# Altium PCB Fast_Servo.PCBDOC (part 6 of 11)
Units mm, origin at the board's own origin, x right, y up, seen from the top; angles counter-clockwise.
Board outline 162.48 x 100 mm, 6 copper layers (Top, GP1(GND), L3, L4, P3V3, Bot), stack 1.716 mm thick; 668 components, 491 nets, 2308 pads, 1133 vias.
Unrouted connection lines stored in the file: 2.
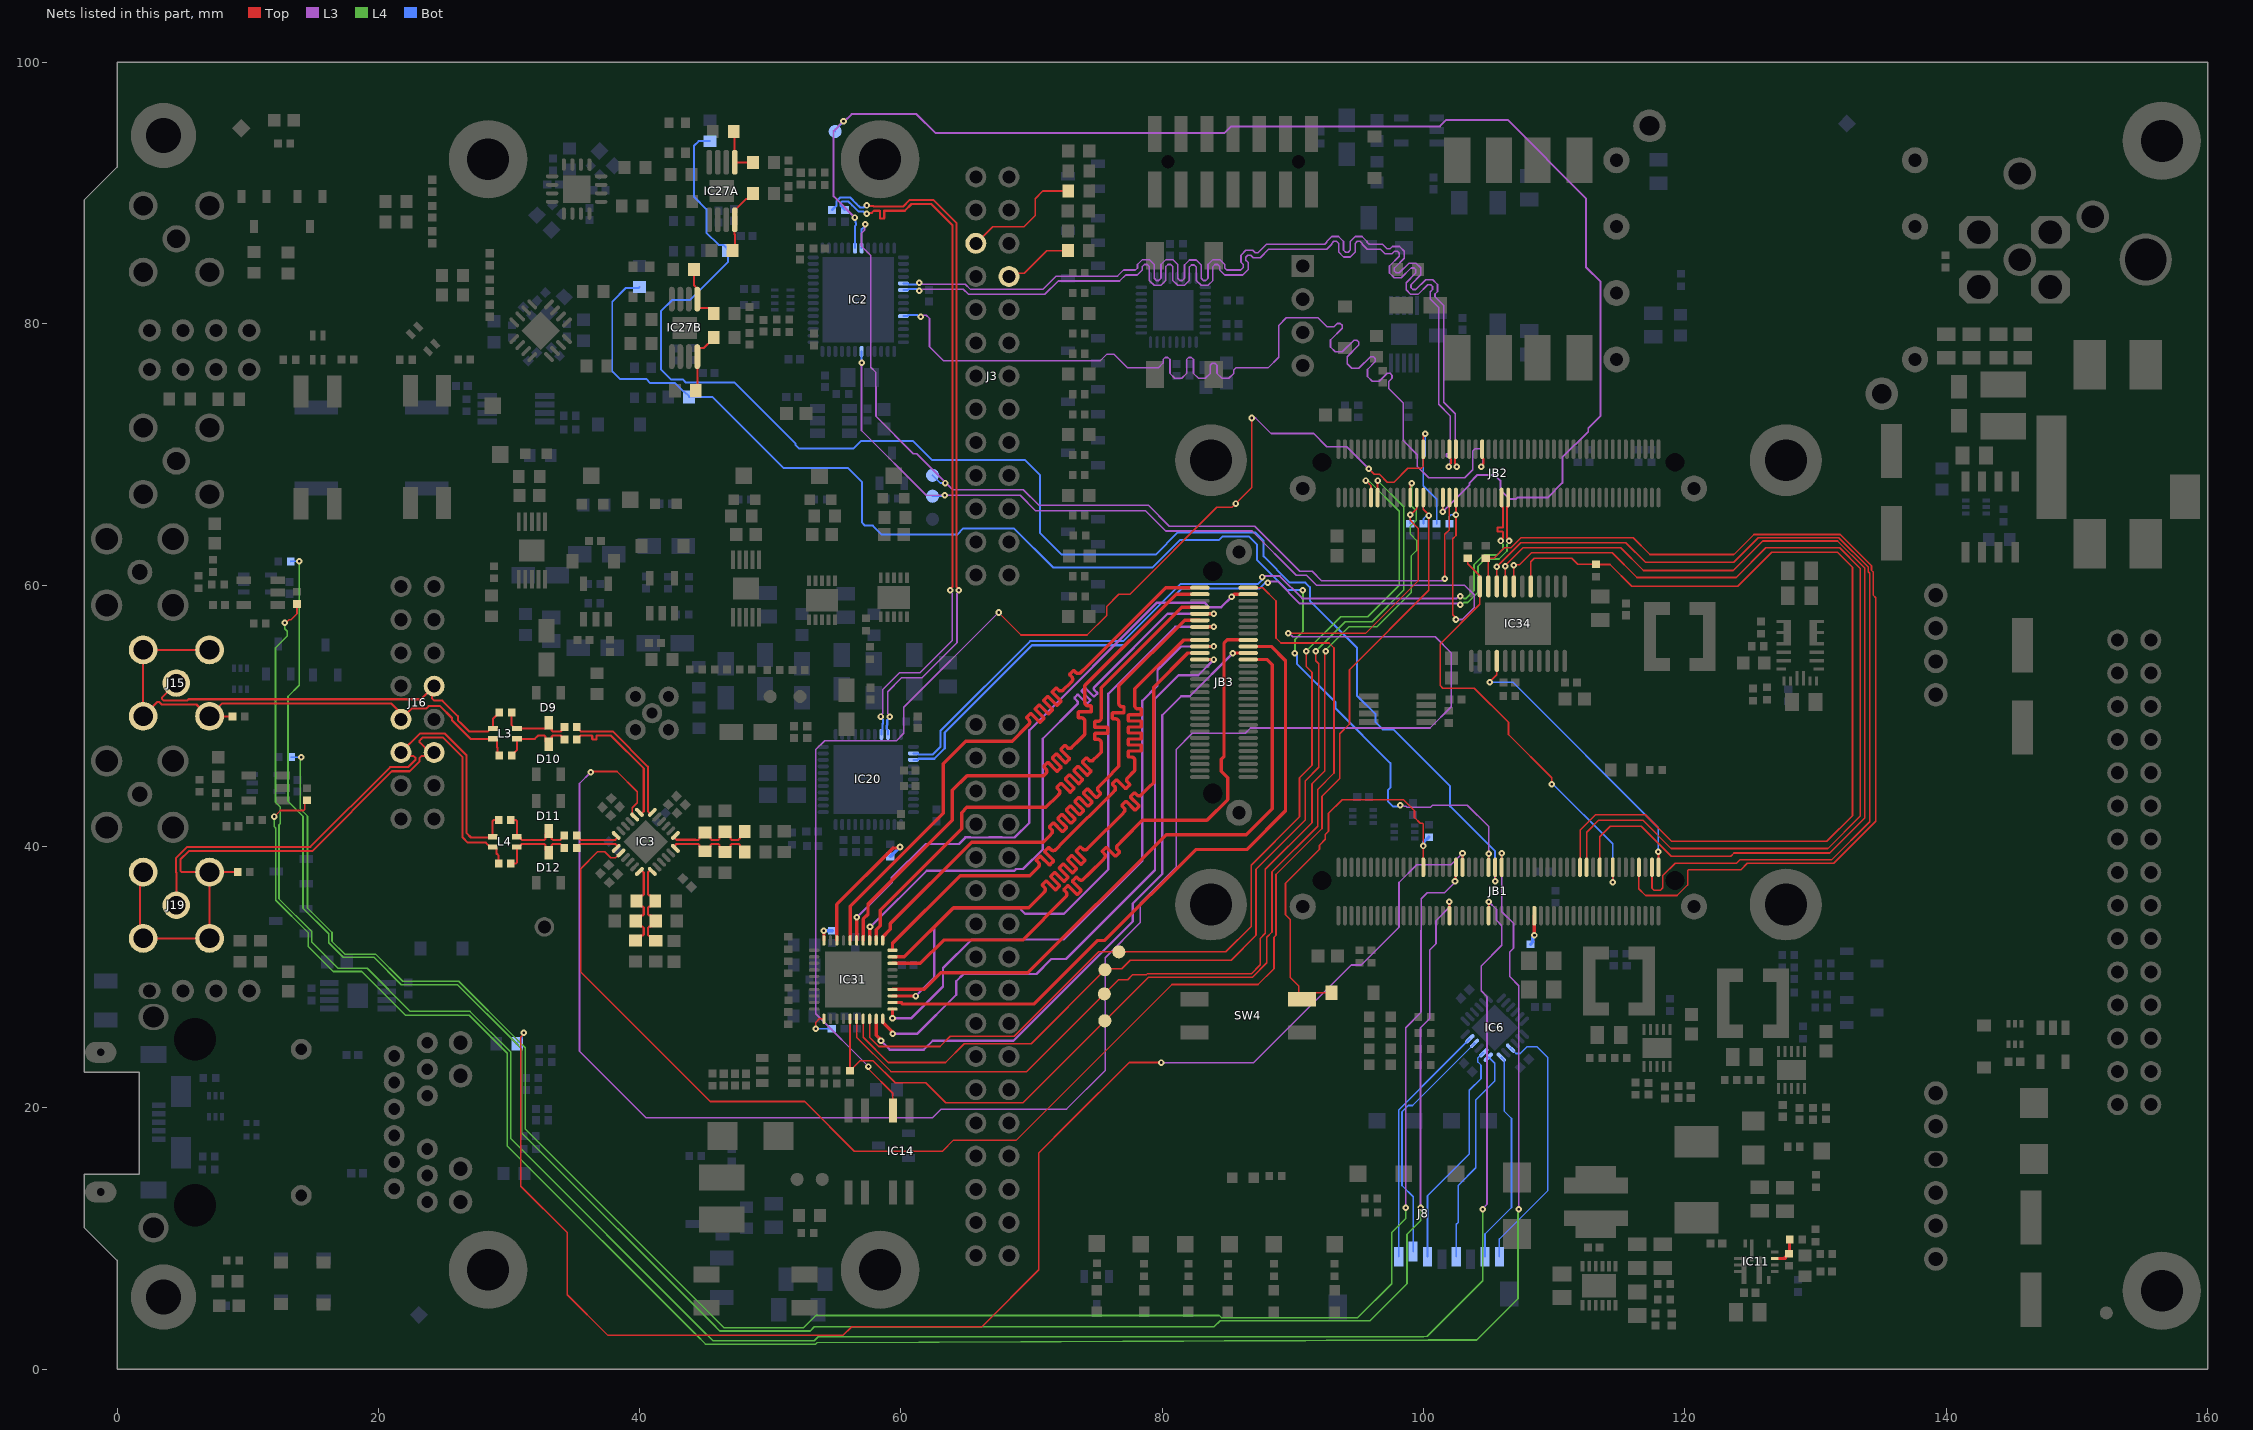
[diagram p8: the nets of this part, all layers, seen from the top]

## Via types
v1: diameter 0.5, hole 0.2, Top to Bot, tented both sides, 1045 vias
v2: diameter 0.8, hole 0.4, Top to Bot, tented both sides, 40 vias
v3: diameter 0.6, hole 0.3, Top to Bot, tented both sides, 27 vias
v4: diameter 1.27, hole 0.711, Top to Bot, tented both sides, 11 vias
v5: diameter 0.7, hole 0.5, Top to Bot, tented both sides, 10 vias

## Nets (pads, with @x,y where several pads share a name; then routed paths per layer and width w, separated by ;. In a path a pad name is that pad's centre, name@x,y a point inside that pad or via, vN(x,y) a via of type N, cw(c..) or ccw(c..) an arc to the next point about the centre after c; other vN are vias at no path point) (continued)
ADC_CTRL.DCO_P: IC2.36 JB2.45 | length 78.5
  Top w0.16: v1(104.423,69.055) 104.423,69.149 104.584,69.311 104.584,69.654 104.475,69.764 JB2.45@104.475,70.404
  L3 w0.125: v1(61.504,80.525) 61.605,80.525 61.731,80.651 61.941,80.651 62.184,80.408 62.184,78.247 63.271,77.16 75.24,77.16 75.737,77.657 76.333,77.657 77.366,76.624 79.68,76.624 80.059,77.004 80.059,77.264 80.22,77.424 80.424,77.424 80.584,77.264 80.584,76.204 80.964,75.824 81.48,75.824 81.86,76.204 81.86,77.264 82.02,77.424 82.224,77.424 82.384,77.264 82.384,76.204 82.764,75.824 83.28,75.824 83.66,76.204 83.66,76.829 83.82,76.989 84.024,76.989 84.185,76.829 84.185,76.204 84.564,75.824 85.08,75.824 85.46,76.204 85.46,76.464 85.62,76.624 86.11,76.624 88.097,76.624 88.904,77.431 88.904,79.87 89.494,80.46 91.91,80.46 92.6,79.77 93.137,79.77 93.392,80.024 93.618,80.024 93.763,79.88 93.763,79.653 92.872,78.762 92.872,78.225 93.236,77.861 93.773,77.861 94.664,78.752 94.891,78.752 95.036,78.607 95.036,78.38 94.145,77.489 94.145,76.952 94.509,76.588 95.046,76.588 95.937,77.479 96.164,77.479 96.308,77.334 96.308,77.108 95.705,76.504 95.705,75.967 96.069,75.602 96.607,75.602 97.21,76.206 97.437,76.206 97.581,76.061 97.581,75.835 97.327,75.58 97.327,75.043 98.437,73.932 98.437,71.066 99.52,69.984 99.52,69.086 100.388,68.218 103.137,68.218 103.755,68.836 103.755,70.269 103.925,70.439 104.38,70.439 104.549,70.27 104.549,69.283 104.423,69.157 v1(104.423,69.055)
  Bot w0.16: IC2.36@60.184,80.589 60.497,80.589 60.587,80.678 61.258,80.678 61.412,80.525 v1(61.504,80.525)
ADC_CTRL.FR_N: IC2.31 JB2.37 | length 77.3
  Top w0.16: JB2.37@102.475,70.404 102.475,69.764 102.389,69.678 102.389,69.311 102.55,69.149 v1(102.55,69.055)
  L3 w0.125: v1(61.405,83.152) 61.506,83.152 61.632,83.026 64.925,83.026 65.32,82.63 70.86,82.63 71.88,83.651 76.573,83.651 77.037,84.115 77.939,84.115 78.099,84.275 78.099,84.535 78.479,84.915 78.994,84.915 79.374,84.535 79.374,83.475 79.534,83.315 79.739,83.315 79.899,83.475 79.899,84.535 80.279,84.915 80.794,84.915 81.174,84.535 81.174,83.475 81.334,83.315 81.539,83.315 81.699,83.475 81.699,84.5 82.079,84.88 82.594,84.88 82.974,84.5 82.974,83.475 83.134,83.315 83.339,83.315 83.499,83.475 83.499,84.535 83.879,84.915 84.394,84.915 84.774,84.535 84.774,84.275 84.934,84.115 86.009,84.115 86.204,84.309 86.204,84.536 86.02,84.719 86.02,85.257 86.384,85.621 86.921,85.621 87.105,85.437 87.332,85.437 87.98,86.085 92.436,86.085 92.596,86.245 92.596,86.305 92.976,86.685 93.491,86.685 93.871,86.305 93.871,85.645 94.031,85.485 94.236,85.485 94.396,85.645 94.396,86.305 94.776,86.685 95.291,86.685 95.671,86.305 95.671,86.245 95.831,86.085 96.851,86.085 97.202,85.735 97.428,85.735 97.612,85.918 98.149,85.918 98.514,85.554 98.514,85.017 97.764,84.267 97.764,84.041 97.909,83.896 98.135,83.896 98.885,84.646 99.422,84.646 99.786,84.281 99.786,83.744 99.037,82.995 99.037,82.768 99.182,82.623 99.408,82.623 100.158,83.373 100.695,83.373 101.059,83.008 101.059,82.471 100.875,82.287 100.875,82.061 101.54,81.396 101.54,73.991 102.424,73.106 102.424,70.101 102.424,69.283 102.55,69.157 v1(102.55,69.055)
  Bot w0.16: IC2.31@60.184,83.088 60.497,83.088 60.587,82.998 61.16,82.998 61.313,83.152 v1(61.405,83.152)
ADC_CTRL.FR_P: IC2.32 JB2.35 | length 77.2
  Top w0.16: v1(101.923,69.055) 101.923,69.149 102.084,69.311 102.084,69.654 101.975,69.764 JB2.35@101.975,70.404
  L3 w0.125: v1(61.405,82.525) 61.506,82.525 61.632,82.651 64.769,82.651 65.165,82.255 71.015,82.255 72.036,83.276 76.729,83.276 77.193,83.74 78.094,83.74 78.474,84.12 78.474,84.38 78.634,84.54 78.839,84.54 78.999,84.38 78.999,83.32 79.379,82.94 79.894,82.94 80.274,83.32 80.274,84.38 80.434,84.54 80.639,84.54 80.799,84.38 80.799,83.32 81.179,82.94 81.694,82.94 82.074,83.32 82.074,84.345 82.234,84.505 82.439,84.505 82.599,84.345 82.599,83.32 82.979,82.94 83.494,82.94 83.874,83.32 83.874,84.38 84.034,84.54 84.239,84.54 84.399,84.38 84.399,84.12 84.779,83.74 86.165,83.74 86.579,84.154 86.579,84.691 86.395,84.875 86.395,85.101 86.54,85.246 86.766,85.246 86.95,85.062 87.487,85.062 88.135,85.71 92.591,85.71 92.971,86.09 92.971,86.15 93.131,86.31 93.336,86.31 93.496,86.15 93.496,85.49 93.876,85.11 94.391,85.11 94.771,85.49 94.771,86.15 94.931,86.31 95.136,86.31 95.296,86.15 95.296,86.09 95.676,85.71 96.696,85.71 97.046,85.36 97.584,85.36 97.767,85.543 97.994,85.543 98.139,85.399 98.139,85.172 97.389,84.423 97.389,83.886 97.753,83.521 98.291,83.521 99.04,84.271 99.267,84.271 99.411,84.126 99.411,83.899 98.662,83.15 98.662,82.613 99.026,82.248 99.563,82.248 100.313,82.998 100.539,82.998 100.684,82.853 100.684,82.627 100.5,82.443 100.5,81.906 101.165,81.241 101.165,73.835 102.049,72.951 102.049,70.101 cw(c102.012,70.101) 102.012,70.064 101.787,70.064 ccw(c101.787,70.026) 101.749,70.026 101.749,69.851 ccw(c101.787,69.851) 101.787,69.814 102.012,69.814 cw(c102.012,69.776) 102.049,69.776 102.049,69.564 102.049,69.535 102.049,69.283 101.923,69.157 v1(101.923,69.055)
  Bot w0.16: IC2.32@60.184,82.589 60.497,82.589 60.587,82.678 61.16,82.678 61.313,82.525 v1(61.405,82.525)
ADC_SCK: IC2.20 JB2.34 TP26.1 | length 109
  Top w0.125: v1(101.475,65.629) JB2.34@101.475,66.704
  L3 w0.152: v1(56.464,88.134) 54.842,89.757 54.842,94.747 55.597,95.503 55.677,95.503 56.225,96.051 61.187,96.051 62.626,94.611 84.77,94.611 85.275,95.116 101.242,95.116 101.729,95.603 106.422,95.603 112.425,89.6 112.425,84.348 113.549,83.224 113.549,72.96 112.6,72.011 112.6,71.75 110.623,69.774 110.623,67.824 109.496,66.697 107.177,66.697 107.08,66.6 106.57,66.6 105.877,67.293 105.877,67.996 105.444,68.429 104.12,68.429 103.495,67.804 103.495,67.649 v1(101.475,65.629)
  Bot w0.152: TP26.1@54.963,94.721 54.963,94.854 55.6,95.491 v1(55.6,95.5) ; v1(56.464,88.134) 56.531,88.068 56.531,87.749 56.574,87.706 56.574,87.58 56.484,87.49 IC2.20@56.484,85.788
ADC_SDI: IC2.21 JB2.36 TP27.1 | length 73.7
  Top w0.125: v1(101.625,60.5) 101.625,63.892 101.975,64.242 JB2.36@101.975,66.704
  L3 w0.125: v1(57.278,87.629) 57.211,87.563 57.211,87.158 56.984,86.931 56.984,85.941 57.693,85.232 57.693,76.669 58.082,76.28 58.082,75.193 58.087,75.187 58.087,72.921 60.948,70.061 61.212,70.061 63.968,67.305 69.36,67.305 70.54,66.125 78.915,66.125 80.54,64.5 87.073,64.5 90.518,61.055 91.472,61.055 92.205,60.321 101.446,60.321 v1(101.625,60.5)
  Bot w0.125: TP27.1@62.415,68.404 63.005,67.814 v1(63.4,67.814)
  Bot w0.152: IC2.21@56.984,85.788 56.984,87.247 57.278,87.541 v1(57.278,87.629)
ADC_SDO: IC2.46 JB2.38 R184.1 TP28.1 | length 72.5
  Top w0.125: v1(102.475,57.368) 102.475,57.47 102.222,57.723 102.222,63.542 102.475,63.795 v1(102.475,65.4) JB2.38@102.475,66.704
  L3 w0.125: v1(56.984,77.022) 56.984,71.83 61.943,66.871 v1(63.347,66.871) 69.131,66.871 70.323,65.679 78.724,65.679 80.262,64.141 86.867,64.141 90.248,60.76 91.036,60.76 91.796,60 103.13,60 103.876,59.254 103.876,58.293 102.951,57.368 v1(102.475,57.368)
  Bot w0.125: v1(56.984,77.022) IC2.46@56.984,77.888 ; TP28.1@62.415,66.804 63.28,66.804 v1(63.347,66.871) ; R184.1@101.975,64.707 101.975,65.251 102.123,65.4 v1(102.475,65.4)
AFE_GAIN_X10A: JB1.49 R40A.1 R58A.1 | length 114.4
  Top w0.125: v1(105.475,37.329) JB1.49@105.475,38.404
  Bot w0.152: R58A.1@45.374,93.975 44.513,93.975 44.159,93.622 44.159,89.72 45.105,88.774 45.105,86.981 46.052,86.035 46.39,86.035 46.764,85.661 46.764,84.733 43.869,81.838 42.514,81.838 41.629,80.954 41.629,76.512 42.396,75.746 43.298,75.746 43.547,75.497 47.273,75.497 51.922,70.849 51.922,70.744 52.222,70.444 56.35,70.444 56.949,71.044 60.915,71.044 62.366,69.593 69.47,69.593 70.659,68.404 70.659,63.98 72.3,62.339 79.487,62.339 81.186,64.037 87.108,64.037 87.748,63.397 87.748,62.201 89.754,60.194 90.951,60.194 91.3,59.846 91.3,58.803 94.9,55.203 94.9,51.549 96.32,50.129 96.32,49.506 96.869,48.957 97.67,48.957 102.033,44.595 102.033,43.068 105.475,39.625 v1(105.475,37.329)
AFE_GAIN_X10B: JB1.47 R40B.1 R58B.1 | length 103.7
  Top w0.125: JB1.47@104.975,38.404 v1(104.975,39.446)
  L3 w0.125: v1(98.2,43.142) 98.268,43.074 98.637,43.074 98.7,43.012 100.539,43.012 100.678,43.15 103.345,43.15 104.975,41.52 v1(104.975,39.446)
  L4 w0.152: v1(90.149,54.8) 90.149,55.833 90.751,56.436 90.751,59.613 v1(90.75,59.615)
  Bot w0.152: R58B.1@40,82.82 39.935,82.755 38.956,82.755 37.903,81.702 37.903,76.366 38.481,75.788 40.499,75.788 40.821,75.466 42.71,75.466 43.362,74.815 43.412,74.815 43.786,74.441 R40B.1@43.786,74.391 45.593,74.391 51.039,68.946 55.956,68.946 57,67.902 57,64.795 57.245,64.55 57.84,64.55 58.525,63.866 64.295,63.866 64.768,64.339 68.647,64.339 71.634,61.352 79.268,61.352 81.376,63.459 84.356,63.459 84.627,63.731 86.633,63.731 87.246,63.119 87.246,61.946 89.577,59.615 v1(90.75,59.615) ; v1@90.3,54.712 90.3,53.994 93.257,51.036 93.257,50.569 97.45,46.376 97.45,44.503 97.28,44.333 97.28,43.433 97.645,43.068 97.981,43.068 97.989,43.076 98.133,43.076 v1(98.2,43.142)
AFE_OUTA_N: IC27A.5 R41A.2 R203A.1 | length 3.7
  Top w0.152: R41A.2@47.199,94.721 47.274,94.646 47.274,92.499 47.412,92.362 R203A.1@48.675,92.362
AFE_OUTA_P: IC27A.4 R43A.2 R201A.1 | length 5.2
  Top w0.16: R43A.2@47.099,85.594 47.306,85.801 47.306,86.816 47.274,86.848 47.274,88.687 48.155,89.567 48.305,89.567 48.675,89.937 R201A.1@48.675,89.987
AFE_OUTB_N: IC27B.5 R41B.2 R203B.1 | length 4.4
  Top w0.16: R41B.2@44.163,84.165 44.163,82.941 44.413,82.691 IC27B.5@44.413,81.887 44.413,81.347 44.547,81.213 45.295,81.213 45.665,80.843 R203B.1@45.665,80.793
AFE_OUTB_P: IC27B.4 R43B.2 R201B.1 | length 4.8
  Top w0.16: R43B.2@44.3,74.875 44.413,74.988 IC27B.4@44.413,77.487 44.413,77.999 44.547,78.132 44.89,78.132 45.665,78.907 R201B.1@45.665,78.957
AGND_P5V5: IC11.3 R142.1 R143.2 | length 2.4
  Top w0.25: IC11.3@126.877,8.47 127.667,8.47 127.667,8.569 127.94,8.842 R142.1@127.96,8.842 127.998,8.881 127.998,9.881 R143.2@128.037,9.92
AT_EVENT: IC14.4 JB2.27 R152.1 | length 105.7
  Top w0.125: v1(57.513,23.155) 57.513,22.97 59.381,21.102 IC14.4@59.381,19.803 ; v1(67.47,57.904) 69.191,56.183 74.241,56.183 75.739,57.682 75.739,58.366 76.678,59.305 77.527,59.305 84.176,65.954 85.338,65.954 v1(85.628,66.244) 86.85,67.465 v1(86.85,72.79) ; v1(95.804,68.905) 96.229,68.48 96.625,68.48 97.222,67.883 97.736,67.883 98.794,68.941 99.83,68.941 99.975,69.086 JB2.27@99.975,70.404 99.975,71.45 v1(100.125,71.6)
  L3 w0.125: v1(57.513,23.155) 53.476,27.191 53.476,47.421 54.156,48.1 59.65,48.1 60.208,48.658 60.208,50.642 v1(67.47,57.904) ; v1(86.85,72.79) 87.135,72.79 88.325,71.6 91.585,71.6 92.585,70.6 94.109,70.6 v1(95.804,68.905)
  Bot w0.125: v1(95.804,68.905) v1@95.817,68.891 ; v1(100.125,71.6) 100.125,69.885 99.975,69.735 99.975,67.599 101,66.574 R152.1@101,64.67
CH1_DAC_IN_R_N: C53.1 IC3.7 R59.1 R61.2 | length 7.2
  Top w0.16: IC3.7@42.734,40.845 42.654,40.765 42.654,40.674 42.818,40.51 44.268,40.51 44.27,40.507 44.485,40.507 44.579,40.601 44.579,40.698 44.949,41.068 R59.1@44.999,41.068 45.049,41.068 45.419,40.698 45.419,40.601 45.513,40.507 46.023,40.507 46.117,40.601 46.117,40.726 46.512,41.121 C53.1@46.537,41.121 46.562,41.121 46.957,40.726 46.957,40.601 47.051,40.507 47.554,40.507 47.665,40.619 47.665,40.773 R61.2@48.035,41.143
CH1_DAC_IN_R_P: C55.1 IC3.6 R65.2 R67.1 | length 7.2
  Top w0.16: IC3.6@42.734,39.855 42.654,39.935 42.654,40.026 42.818,40.19 44.135,40.19 44.137,40.187 44.485,40.187 44.579,40.094 44.579,39.997 44.949,39.627 R67.1@44.999,39.627 45.049,39.627 45.419,39.997 45.419,40.094 45.513,40.187 46.023,40.187 46.117,40.094 46.117,39.969 46.512,39.574 C55.1@46.537,39.574 46.562,39.574 46.957,39.969 46.957,40.094 47.051,40.187 47.589,40.187 47.665,40.111 47.665,39.957 R65.2@48.035,39.587
CH1_DAC_OUT_D_N: D10.3 L3.1 R64.2 R66.1 | length 6.3
  Top w0.16: R66.1@30.198,46.946 30.198,46.966 30.622,47.39 L3.1@30.622,48.236 ; L3.1@30.682,48.176 30.742,48.236 31.977,48.236 32.235,48.494 32.701,48.494 32.79,48.404 32.79,48.061 D10.3@33.03,47.821 33.27,48.061 33.27,48.404 33.359,48.494 33.727,48.494 33.731,48.497 33.946,48.497 34.035,48.408 34.035,48.385 R64.2@34.249,48.171
CH1_DAC_OUT_D_P: D9.3 L3.2 R60.1 R62.2 | length 6
  Top w0.152: R60.1@30.198,50.246 30.198,49.285 30.447,49.036 L3.2@30.622,49.036 32.781,49.036 33.03,49.285 D9.3@33.03,49.471
  Top w0.16: D9.3@33.03,49.471 33.27,49.231 33.27,48.887 33.359,48.798 33.601,48.798 33.605,48.802 33.946,48.802 34.035,48.891 34.035,48.914 R62.2@34.249,49.128
CH1_DAC_OUT_N: IC3.13 R64.1 | length 10.5
  Top w0.16: R64.1@35.189,48.171 35.189,48.191 35.487,48.489 35.975,48.489 36.053,48.489 36.325,48.489 cw(c36.325,48.441) 36.373,48.441 36.373,48.237 ccw(c36.421,48.237) 36.421,48.189 36.645,48.189 ccw(c36.645,48.237) 36.693,48.237 36.693,48.441 cw(c36.741,48.441) 36.741,48.489 36.853,48.489 37.8,48.489 40.311,45.978 40.311,43.775 40.311,42.697 40.147,42.533 40.056,42.533 IC3.13@39.976,42.613
CH1_DAC_OUT_P: IC3.12 R62.1 | length 10.6
  Top w0.16: R62.1@35.189,49.128 35.189,49.108 35.487,48.809 37.932,48.809 40.631,46.11 40.631,43.642 40.631,42.697 40.795,42.533 40.886,42.533 IC3.12@40.966,42.613
CH2_DAC_IN_R_N: C61.1 IC3.1 R69.1 R71.2 | length 7.2
  Top w0.16: IC3.1@40.966,38.087 40.886,38.167 40.795,38.167 40.631,38.003 40.631,36.919 40.634,36.916 40.634,36.336 40.727,36.242 40.824,36.242 41.194,35.872 R69.1@41.194,35.822 41.194,35.772 40.824,35.402 40.727,35.402 40.634,35.308 40.634,34.798 40.727,34.704 40.852,34.704 41.247,34.309 C61.1@41.247,34.284 41.247,34.259 40.852,33.864 40.727,33.864 40.634,33.77 40.634,33.245 40.722,33.156 40.864,33.156 R71.2@41.234,32.786
CH2_DAC_IN_R_P: C63.1 IC3.24 R75.2 R77.1 | length 7.2
  Top w0.16: R75.2@39.696,32.804 40.066,33.174 40.215,33.174 40.314,33.273 40.314,33.77 40.22,33.864 40.095,33.864 39.7,34.259 C63.1@39.7,34.284 39.7,34.309 40.095,34.704 40.22,34.704 40.314,34.798 40.314,35.308 40.22,35.402 40.123,35.402 39.753,35.772 R77.1@39.753,35.822 39.753,35.872 40.123,36.242 40.22,36.242 40.314,36.336 40.314,36.756 40.311,36.759 40.311,38.003 40.147,38.167 40.056,38.167 IC3.24@39.976,38.087
CH2_DAC_OUT_D_N: D12.3 L4.1 R74.2 R76.1 | length 6.5
  Top w0.16: R76.1@30.17,38.7 30.187,38.683 30.524,38.683 30.6,38.758 L4.1@30.6,39.95 30.775,39.95 30.899,40.074 30.899,40.109 30.988,40.198 32.696,40.198 32.785,40.109 32.785,39.765 D12.3@33.025,39.525 33.265,39.765 33.265,40.109 33.354,40.198 33.927,40.198 34.23,39.895 R74.2@34.23,39.875
CH2_DAC_OUT_D_P: D11.3 L4.2 R70.1 R72.2 | length 6.5
  Top w0.16: R70.1@30.145,42.025 30.523,42.025 30.6,41.948 L4.2@30.6,40.75 30.775,40.75 30.899,40.626 30.899,40.591 30.988,40.502 32.696,40.502 32.785,40.591 32.785,40.935 D11.3@33.025,41.175 33.265,40.935 33.265,40.591 33.354,40.502 33.927,40.502 34.23,40.805 R72.2@34.23,40.825
CH2_DAC_OUT_N: IC3.19 R74.1 | length 3.6
  Top w0.16: R74.1@35.17,39.875 35.17,39.895 35.469,40.194 35.688,40.194 37.122,40.194 38.139,40.194 38.295,40.038 38.295,39.941 IC3.19@38.209,39.855
CH2_DAC_OUT_P: IC3.18 R72.1 | length 3.6
  Top w0.16: R72.1@35.17,40.825 35.17,40.805 35.469,40.506 35.817,40.506 37.251,40.506 38.139,40.506 38.295,40.662 38.295,40.759 IC3.18@38.209,40.845
CLK2_N: IC20.24 JB2.52 | length 59.4
  Top w0.16: JB2.52@105.975,66.704 105.975,66.066 106.065,65.976 106.065,64.725 106.065,64.457 cw(c106.017,64.457) 106.017,64.409 105.713,64.409 ccw(c105.713,64.361) 105.665,64.361 105.665,64.137 ccw(c105.713,64.137) 105.713,64.089 106.017,64.089 cw(c106.017,64.041) 106.065,64.041 106.065,63.929 106.065,63.625
  L3 w0.152: v1(87.642,60.619) 87.708,60.685 89.001,60.685 90.702,58.984 102.533,58.984 102.706,59.157 v1(102.8,59.157)
  L4 w0.13: v1(102.8,59.157) 102.888,59.157 103.061,58.983 103.252,58.983 103.855,59.587 103.855,61.566 104.596,62.306 105.638,62.306 106.07,62.738 106.07,63.011 106.07,63.121 v1@105.937,63.253
  Bot w0.16: IC20.24@60.95,47.125 61.263,47.125 61.353,47.035 62.425,47.035 63.027,47.637 63.027,48.852 69.893,55.718 77.025,55.718 81.379,60.072 87.312,60.072 v1@87.65,60.409
  other v1: 105.911,63.38
CLK2_P: IC20.25 JB2.54 | length 59.1
  Top w0.16: 106.385,63.625 106.385,65.976 106.475,66.066 JB2.54@106.475,66.704
  L3 w0.152: v1(88.085,60.175) 88.151,60.242 88.151,60.283 88.835,60.283 90.535,58.582 v1@102.8,58.582
  L4 w0.13: v1(102.8,58.5) 102.887,58.5 103.061,58.673 103.38,58.673 104.165,59.459 104.165,61.437 104.724,61.996 105.766,61.996 106.38,62.61 106.38,62.882 106.38,63.121 106.538,63.279 v1(106.538,63.38)
  Bot w0.16: IC20.25@60.95,46.625 61.263,46.625 61.353,46.715 62.558,46.715 63.347,47.504 63.347,48.72 70.026,55.398 77.158,55.398 81.511,59.752 87.444,59.752 v1@87.876,60.183
CLK_100M: JB1.62 R160.2 | length 2.3
  Top w0.254: JB1.62@108.475,34.704 108.479,34.7 108.479,33.202 v1(108.483,33.198)
  Bot w0.254: R160.2@108.195,32.527 108.358,32.69 108.358,33.006 108.483,33.131 v1(108.483,33.198)
CMLI: IC31.31 R18.1 | length 2.5
  Top w0.125: v1(53.476,26.039) 53.476,26.53 53.751,26.805 IC31.31@54.101,26.805
  Bot w0.125: v1(53.476,26.039) 54.694,26.039 R18.1@54.701,26.047
CMLQ: IC31.20 R17.1 | length 1.4
  Top w0.25: IC31.20@54.101,32.805 v1(54.101,33.55)
  Bot w0.3: v1(54.101,33.55) R17.1@54.726,33.55
DAC_0_N: J15.2 J16.9 L3.4 R66.2 R189.2 | length 43.8
  Top w0.16: J15.2@7.08,55.04 J15.2@2,55.04 J15.2@2,49.96 3.091,51.051 3.223,51.051 3.411,50.863 6.088,50.863 6.991,49.96 J15.2@7.08,49.96 ; R189.2@8.84,49.96 J15.2@7.08,49.96 ; J16.9@21.73,49.73 J16.9@21.96,49.96 ; R66.2@29.258,46.946 29.125,47.079 29.125,47.547 29.067,47.605 29.067,48.116 28.947,48.236 L3.4@28.772,48.236 27.054,48.236 25.637,49.652 25.637,49.83 24.731,50.737 23.853,50.737 23.672,50.556 22.556,50.556 J16.9@21.96,49.96 ; J15.2@7.08,49.96 8.067,50.947 9.888,50.947 9.892,50.943 20.977,50.943 J16.9@21.96,49.96
DAC_0_P: J15.1 J16.8 L3.3 R60.2 | length 31.4
  Top w0.16: J15.1@4.54,52.5 3.449,51.409 3.449,51.277 3.543,51.183 5.38,51.183 5.464,51.267 10.021,51.267 10.025,51.263 23.263,51.263 24.15,52.15 J16.8@24.27,52.15 ; J16.8@24.27,52.27 J16.8@24.27,52.15 ; L3.3@28.772,49.036 28.597,49.036 28.477,48.916 28.477,48.889 28.383,48.796 26.97,48.796 26.289,49.477 26.267,49.477 26.089,49.655 26.089,49.976 24.906,51.16 24.27,51.16 24.101,51.329 24.101,51.711 24.27,51.88 J16.8@24.27,52.15 ; L3.3@28.772,49.036 28.774,49.761 R60.2@29.258,50.246
DAC_1_N: J16.12 J19.2 L4.4 R76.2 R190.2 | length 59.5
  Top w0.16: J19.2@1.75,38.134 1.75,33.21 J19.2@2,32.96 J19.2@7.08,32.96 7.08,37.952 7.168,38.04 R190.2@9.228,38.04 ; J19.2@7.08,38.04 4.944,38.04 4.85,38.134 4.85,38.997 5.497,39.644 14.93,39.644 21.038,45.752 22.401,45.752 23.16,46.511 23.16,46.776 23.298,46.915 23.995,46.915 J16.12@24.27,47.19 23.929,47.19 23.156,47.963 23.156,48.095 23.298,48.237 23.407,48.346 24.936,48.346 26.45,46.832 26.45,40.685 26.839,40.296 28.229,40.296 28.575,39.95 L4.4@28.75,39.95 28.925,39.95 29.045,39.83 29.045,39.46 29.205,39.3 R76.2@29.205,38.7
DAC_1_P: J16.11 J19.1 L4.3 R70.2 | length 42.6
  Top w0.16: J19.1@4.54,35.5 4.54,37.723 4.557,37.74 4.557,37.974 4.53,38.001 4.53,39.13 5.364,39.964 14.798,39.964 20.906,46.072 22.268,46.072 22.84,46.644 22.84,46.776 22.702,46.915 22.006,46.915 J16.11@21.73,47.19 23.196,48.656 25.064,48.656 26.76,46.96 26.76,41.019 27.094,40.685 28.685,40.685 L4.3@28.75,40.75 28.75,41.95 28.825,42.025 R70.2@29.205,42.025
DAC_AFE_CH1_nPD: IC3.14 JB2.26 R68.1 | length 157.6
  Top w0.125: v1(36.255,45.673) 36.255,45.74 38.273,45.74 39.817,44.196 39.817,43.347 39.428,42.959 39.428,42.454 IC3.14@39.623,42.259 ; v1(89.63,56.305) 95.558,56.305 99.575,60.322 99.575,64.364 98.975,64.964 98.975,65.359 99.465,65.849 99.465,66.694 JB2.26@99.475,66.704
  L3 w0.125: v1(36.255,45.673) 35.4,44.818 35.4,24.32 40.47,19.25 62.425,19.25 63.075,19.9 72.675,19.9 75.634,22.859 75.634,31.487 78.324,34.177 78.324,35.671 81.059,38.406 81.059,47.426 82.291,48.658 86.34,48.658 86.75,49.068 100.493,49.068 102.125,50.7 102.125,54.8 100.887,56.038 89.982,56.038 89.714,56.305 v1(89.63,56.305)
  Bot w0.125: R68.1@98.975,64.707 v1(98.975,65.4)
DAC_AFE_CH2_nPD: IC3.20 JB2.28 R78.1 | length 118.4
  Top w0.125: IC3.20@38.562,39.501 38.515,39.501 38.152,39.139 37.777,39.139 37.328,39.588 36.781,39.588 35.492,38.299 35.492,30.388 45.405,20.475 52.635,20.475 56.43,16.68 63.18,16.68 64.026,17.526 68.836,17.526 80.74,29.43 87.329,29.43 88.545,30.646 88.545,33.043 88.7,33.198 88.7,37.85 92.225,41.375 92.225,43.852 93.576,45.203 93.576,48.62 94.325,49.369 94.325,53.532 100.4,59.607 v1(100.4,65.326) 100.4,65.378 99.975,65.803 JB2.28@99.975,66.704
  Bot w0.125: R78.1@99.987,64.707 99.987,65.087 100.226,65.326 v1(100.4,65.326)
DAC_AUX_BIN: IC34.5 JB1.75 R121.1 | length 73.9
  Top w0.125: IC34.5@108.2,59.905 108.2,61.778 108.475,62.053 111.332,62.053 111.793,61.592 R121.1@113.179,61.592 113.196,61.575 114.266,61.575 115.923,59.917 124.041,59.917 126.649,62.525 131.674,62.525 132.825,61.374 132.825,42.354 130.863,40.393 118.979,40.393 116.956,42.415 113.149,42.415 111.975,41.241 JB1.75@111.975,38.404
DAC_AUX_nCLR: IC34.11 JB1.85 R122.1 | length 34.5
  Top w0.125: R122.1@103.38,62.059 103.38,61.628 104.3,60.708 IC34.11@104.3,59.905 104.3,58.525 101.285,55.51 101.285,52.295 101.463,52.117 103.875,52.117 106.492,49.5 106.492,48.569 109.8,45.261 v1(109.8,44.746) ; v1(114.475,37.25) JB1.85@114.475,38.404
  Bot w0.125: v1(109.8,44.746) 109.929,44.746 114.475,40.2 v1(114.475,37.25)
DAC_AUX_nLDAC: IC34.10 JB1.93 R120.1 | length 77.2
  Top w0.125: R120.1@104.752,62.059 R120.1@104.95,62.059 ; IC34.10@104.95,59.905 R120.1@104.95,62.059 ; JB1.93@116.475,38.404 116.475,36.754 116.987,36.241 119.397,36.241 120.202,37.047 120.202,38.132 120.295,38.225 124.284,38.225 124.777,38.718 131.392,38.718 134.6,41.927 134.6,59.042 134.4,59.242 134.4,61.012 134.275,61.137 134.275,61.49 131.886,63.88 125.278,63.88 123.747,62.349 117.331,62.349 116.054,63.625 107.455,63.625 106.684,62.855 106.18,62.855 105.384,62.059 R120.1@104.95,62.059
DAC_AUX_nSYNC: IC34.7 JB1.77 | length 75.7
  Top w0.125: IC34.7@106.9,59.905 v1@106.9,61.406 ; v1(106.9,61.53) 106.924,61.554 107.337,61.554 108.263,62.48 114.425,62.48 116.325,60.58 123.917,60.58 126.192,62.855 131.85,62.855 133.425,61.28 133.425,42.325 130.941,39.841 118.94,39.841 116.763,42.018 113.398,42.018 112.475,41.095 JB1.77@112.475,38.404
DAC_AUX_SCLK: IC34.8 JB1.81 | length 76.1
  Top w0.125: IC34.8@106.255,60.24 v1(106.255,61.453) 106.255,61.504 107.606,62.855 115.093,62.855 116.825,61.122 123.706,61.122 125.963,63.38 131.679,63.38 133.775,61.283 133.775,42.2 131.078,39.503 123.747,39.503 123.5,39.256 118.953,39.256 116.66,41.55 114.276,41.55 113.475,40.749 JB1.81@113.475,38.404
DAC_AUX_SDIN: IC34.9 JB1.97 | length 73.6
  Top w0.125: IC34.9@105.6,59.905 v1(105.6,61.406) 105.6,61.416 107.433,63.25 115.475,63.25 116.975,61.75 123.725,61.75 125.605,63.63 131.782,63.63 134.025,61.387 134.025,61.033 134.15,60.908 134.15,41.9 131.218,38.968 124.185,38.968 123.942,38.725 119.256,38.725 118.312,37.782 118.312,36.833 118.125,36.645 117.633,36.645 117.475,36.804 JB1.97@117.475,38.404
DAC_AUX_SDO: IC34.16 JB1.99 | length 22.4
  Top w0.125: v1(105.062,52.56) 105.062,52.598 105.6,53.135 IC34.16@105.6,54.205 ; v1(117.967,39.602) 117.975,39.595 JB1.99@117.975,38.404
  Bot w0.125: v1(105.062,52.56) 106.839,52.56 117.967,41.431 v1(117.967,39.602)
DAC_CLKIN: IC31.18 R172.2 | length 10.5
  Top w0.26: IC31.18@55.101,32.805 55.096,32.81 55.096,35.559 59.419,39.882 59.786,39.882 59.861,39.957 v1(59.926,39.957)
  Bot w0.26: R172.2@59.176,39.232 59.196,39.232 59.591,39.627 ; 59.592,39.627 59.922,39.957 v1(59.926,39.957)
DAC_DATA0: IC31.15 JB3.58 | length 46.6
  Top w0.26: IC31.15@56.601,32.805 56.606,32.81 v1@56.606,34.568 ; v1(85.3,59.1) 85.3,59.11 85.495,59.305 JB3.58@86.575,59.305
  L3 w0.18: v1(56.611,34.573) 59.282,37.244 59.282,37.582 61.892,40.192 64.43,40.192 64.93,40.692 65.303,40.692 65.31,40.685 66.726,40.685 66.733,40.692 67.708,40.692 67.715,40.685 68.69,40.685 69.825,41.82 69.825,48.9 79.567,58.642 83.258,58.642 83.6,58.3 84.5,58.3 v1(85.3,59.1)
DAC_DATA1: IC31.14 JB3.57 | length 47.8
  Top w0.26: IC31.14@57.101,32.805 57.101,34.451 57.475,34.824 57.475,35.579 63.916,42.019 63.916,44.289 65.052,45.425 70.929,45.425 70.994,45.489 71.086,45.581 ccw(c70.902,45.765) 71.086,45.949 70.965,46.07 cw(c71.013,46.119) 70.965,46.167 71.192,46.395 cw(c71.241,46.346) 71.29,46.395 71.899,45.785 ccw(c71.948,45.834) 71.997,45.785 72.225,46.013 ccw(c72.176,46.062) 72.225,46.111 71.615,46.72 cw(c71.664,46.769) 71.615,46.818 71.843,47.046 cw(c71.892,46.997) 71.94,47.046 72.55,46.436 ccw(c72.599,46.485) 72.648,46.436 72.875,46.664 ccw(c72.826,46.712) 72.875,46.761 72.266,47.371 cw(c72.315,47.42) 72.266,47.468 72.493,47.696 cw(c72.542,47.647) 72.591,47.696 72.712,47.575 ccw(c72.896,47.759) 73.08,47.575 73.664,48.16 74.072,48.567 74.072,49.45 74.072,49.58 ccw(c73.812,49.58) 73.812,49.84 73.641,49.84 cw(c73.641,49.909) 73.572,49.909 73.572,50.231 cw(c73.641,50.231) 73.641,50.3 74.503,50.3 ccw(c74.503,50.369) 74.572,50.369 74.572,50.691 ccw(c74.503,50.691) 74.503,50.76 74.332,50.76 cw(c74.332,51.02) 74.072,51.02 74.072,51.839 74.072,52.318 81.059,59.305 JB3.57@82.875,59.305
DAC_DATA2: IC31.13 JB3.51 | length 47
  Top w0.26: IC31.13@57.601,32.805 57.606,32.81 57.606,33.844 v1(57.63,33.867) ; JB3.51@82.875,57.805 v1(83.95,57.805)
  L3 w0.18: v1(57.63,33.867) 57.692,33.867 61.97,38.145 68.69,38.145 68.814,38.269 69.35,38.269 70.85,39.769 70.85,48.245 73.423,50.819 73.487,50.882 ccw(c73.36,51.009) 73.487,51.137 73.301,51.323 cw(c73.341,51.363) 73.301,51.403 73.489,51.591 cw(c73.529,51.551) 73.57,51.591 74.196,50.965 ccw(c74.236,51.005) 74.277,50.965 74.465,51.153 ccw(c74.425,51.193) 74.465,51.234 73.838,51.86 cw(c73.879,51.9) 73.838,51.941 74.026,52.129 cw(c74.067,52.088) 74.107,52.129 74.734,51.502 ccw(c74.774,51.543) 74.814,51.502 75.002,51.69 ccw(c74.962,51.731) 75.002,51.771 74.816,51.957 cw(c74.944,52.084) 74.816,52.212 75.271,52.667 80.41,57.805 v1(83.95,57.805)
DAC_DATA3: IC31.12 JB3.53 | length 49.1
  Top w0.26: IC31.12@58.101,32.805 58.101,33.624 58.422,33.945 58.422,35.129 64.643,41.35 64.643,42.587 65.042,42.985 71.095,42.985 71.994,43.884 72.086,43.976 ccw(c71.902,44.16) 72.086,44.344 71.965,44.465 cw(c72.014,44.514) 71.965,44.562 72.193,44.79 cw(c72.242,44.741) 72.291,44.79 72.9,44.181 ccw(c72.949,44.229) 72.998,44.181 73.225,44.408 ccw(c73.177,44.457) 73.225,44.506 72.616,45.115 cw(c72.665,45.164) 72.616,45.213 72.843,45.441 cw(c72.892,45.392) 72.941,45.441 73.551,44.831 ccw(c73.599,44.88) 73.648,44.831 73.876,45.059 ccw(c73.827,45.108) 73.876,45.156 73.266,45.766 cw(c73.315,45.815) 73.266,45.864 73.494,46.091 cw(c73.543,46.042) 73.592,46.091 74.201,45.482 ccw(c74.25,45.53) 74.299,45.482 74.526,45.709 ccw(c74.478,45.758) 74.526,45.807 73.917,46.416 cw(c73.966,46.465) 73.917,46.514 74.145,46.742 cw(c74.193,46.693) 74.242,46.742 74.363,46.621 ccw(c74.547,46.805) 74.731,46.621 75.065,46.955 75.325,47.215 75.325,47.805 75.325,47.935 ccw(c75.065,47.935) 75.065,48.195 74.894,48.195 cw(c74.894,48.264) 74.825,48.264 74.825,48.586 cw(c74.894,48.586) 74.894,48.655 75.756,48.655 ccw(c75.756,48.724) 75.825,48.724 75.825,49.046 ccw(c75.756,49.046) 75.756,49.115 74.894,49.115 cw(c74.894,49.184) 74.825,49.184 74.825,49.506 cw(c74.894,49.506) 74.894,49.575 75.065,49.575 ccw(c75.065,49.835) 75.325,49.835 75.325,50.415 75.325,52.135 81.495,58.305 JB3.53@82.875,58.305
DAC_DATA4: IC31.11 JB3.49 | length 49.1
  Top w0.26: IC31.11@58.601,32.805 58.601,33.07 59.18,33.648 59.18,34.102 65.406,40.328 70.876,40.328 71.416,40.868 71.508,40.96 ccw(c71.324,41.143) 71.508,41.327 71.387,41.448 cw(c71.436,41.497) 71.387,41.546 71.615,41.773 cw(c71.664,41.725) 71.712,41.773 72.322,41.164 ccw(c72.371,41.213) 72.419,41.164 72.647,41.392 ccw(c72.598,41.44) 72.647,41.489 72.038,42.099 cw(c72.086,42.147) 72.038,42.196 72.265,42.424 cw(c72.314,42.375) 72.363,42.424 72.972,41.814 ccw(c73.021,41.863) 73.07,41.814 73.298,42.042 ccw(c73.249,42.091) 73.298,42.14 72.688,42.749 cw(c72.737,42.798) 72.688,42.847 72.916,43.074 cw(c72.965,43.026) 73.013,43.074 73.623,42.465 ccw(c73.672,42.514) 73.72,42.465 73.948,42.693 ccw(c73.899,42.741) 73.948,42.79 73.339,43.4 cw(c73.387,43.449) 73.339,43.497 73.566,43.725 cw(c73.615,43.676) 73.664,43.725 74.273,43.115 ccw(c74.322,43.164) 74.371,43.116 74.599,43.343 ccw(c74.55,43.392) 74.599,43.441 73.989,44.05 cw(c74.038,44.099) 73.989,44.148 74.217,44.376 cw(c74.266,44.327) 74.314,44.376 74.924,43.766 ccw(c74.973,43.815) 75.022,43.766 75.249,43.994 ccw(c75.2,44.043) 75.249,44.091 75.128,44.212 cw(c75.312,44.396) 75.128,44.58 75.664,45.115 76.678,46.13 76.678,49.377 76.678,49.507 ccw(c76.418,49.507) 76.418,49.767 76.247,49.767 cw(c76.247,49.836) 76.178,49.836 76.178,50.158 cw(c76.247,50.158) 76.247,50.227 77.004,50.227 ccw(c77.004,50.296) 77.073,50.296 77.073,50.618 ccw(c77.004,50.618) 77.004,50.687 76.938,50.687 cw(c76.938,50.947) 76.678,50.947 76.678,51.447 76.678,52.283 81.709,57.314 81.946,57.314 81.948,57.312 82.867,57.312 JB3.49@82.875,57.305
DAC_DATA5: IC31.10 JB3.43 | length 48.9
  Top w0.26: IC31.10@59.351,32.055 59.351,32.588 64.526,37.763 69.852,37.763 70.415,38.325 70.506,38.417 ccw(c70.323,38.601) 70.506,38.785 70.386,38.905 cw(c70.434,38.954) 70.386,39.003 70.613,39.231 cw(c70.662,39.182) 70.711,39.231 71.32,38.621 ccw(c71.369,38.67) 71.418,38.621 71.646,38.849 ccw(c71.597,38.898) 71.646,38.946 71.036,39.556 cw(c71.085,39.605) 71.036,39.654 71.264,39.881 cw(c71.313,39.832) 71.361,39.881 71.482,39.76 ccw(c71.666,39.944) 71.85,39.76 72.432,40.343 76.246,44.156 76.338,44.248 ccw(c76.154,44.432) 76.338,44.616 76.217,44.737 cw(c76.265,44.785) 76.217,44.834 76.444,45.062 cw(c76.493,45.013) 76.542,45.062 77.151,44.452 ccw(c77.2,44.501) 77.249,44.452 77.477,44.68 ccw(c77.428,44.729) 77.477,44.778 77.356,44.899 cw(c77.54,45.082) 77.356,45.266 77.788,45.699 77.9,45.81 77.9,46.455 77.9,46.585 ccw(c77.64,46.585) 77.64,46.845 77.469,46.845 cw(c77.469,46.914) 77.4,46.914 77.4,47.236 cw(c77.469,47.236) 77.469,47.305 78.331,47.305 ccw(c78.331,47.374) 78.4,47.374 78.4,47.696 ccw(c78.331,47.696) 78.331,47.765 77.469,47.765 cw(c77.469,47.834) 77.4,47.834 77.4,48.156 cw(c77.469,48.156) 77.469,48.225 78.331,48.225 ccw(c78.331,48.294) 78.4,48.294 78.4,48.616 ccw(c78.331,48.616) 78.331,48.685 77.469,48.685 cw(c77.469,48.754) 77.4,48.754 77.4,49.076 cw(c77.469,49.076) 77.469,49.145 78.331,49.145 ccw(c78.331,49.214) 78.4,49.214 78.4,49.536 ccw(c78.331,49.536) 78.331,49.605 77.469,49.605 cw(c77.469,49.674) 77.4,49.674 77.4,49.996 cw(c77.469,49.996) 77.469,50.065 78.331,50.065 ccw(c78.331,50.134) 78.4,50.134 78.4,50.456 ccw(c78.331,50.456) 78.331,50.525 78.16,50.525 cw(c78.16,50.785) 77.9,50.785 77.9,51.559 77.9,52.06 81.64,55.8 82.87,55.8 JB3.43@82.875,55.805
DAC_DATA6: IC31.9 JB3.39 | length 48.3
  Top w0.26: IC31.9@59.351,31.555 60.252,31.555 64.019,35.322 69.775,35.322 70.876,36.424 70.968,36.515 ccw(c70.784,36.699) 70.968,36.883 70.847,37.004 cw(c70.896,37.053) 70.847,37.102 71.075,37.329 cw(c71.124,37.281) 71.172,37.329 71.782,36.72 ccw(c71.831,36.769) 71.879,36.72 72.107,36.947 ; 72.107,36.947 ccw(c72.058,36.996) 72.107,37.045 71.498,37.655 cw(c71.546,37.703) 71.498,37.752 71.725,37.98 cw(c71.774,37.931) 71.823,37.98 72.432,37.37 ccw(c72.481,37.419) 72.53,37.37 72.758,37.598 ccw(c72.709,37.647) 72.758,37.696 72.148,38.305 cw(c72.197,38.354) 72.148,38.403 72.376,38.63 cw(c72.425,38.582) 72.473,38.63 73.083,38.021 ccw(c73.132,38.07) 73.18,38.021 73.408,38.249 ccw(c73.359,38.297) 73.408,38.346 72.799,38.956 cw(c72.847,39.004) 72.799,39.053 73.026,39.281 cw(c73.075,39.232) 73.124,39.281 73.733,38.671 ccw(c73.782,38.72) 73.831,38.671 74.059,38.899 ccw(c74.01,38.948) 74.059,38.997 73.449,39.606 cw(c73.498,39.655) 73.449,39.704 73.677,39.931 cw(c73.726,39.883) 73.774,39.931 73.895,39.811 ccw(c74.079,39.994) 74.263,39.811 74.614,40.161 76.968,42.516 77.06,42.608 ccw(c76.876,42.791) 77.06,42.975 76.939,43.096 cw(c76.988,43.145) 76.939,43.194 77.167,43.422 cw(c77.216,43.373) 77.264,43.422 77.874,42.812 ccw(c77.923,42.861) 77.972,42.812 78.199,43.04 ccw(c78.15,43.088) 78.199,43.137 77.59,43.747 cw(c77.639,43.796) 77.59,43.844 77.817,44.072 cw(c77.866,44.023) 77.915,44.072 78.036,43.951 ccw(c78.22,44.135) 78.404,43.951 78.966,44.514 79.341,44.888 79.341,52.183 81.962,54.805 JB3.39@82.875,54.805
DAC_DATA7: IC31.8 JB3.44 | length 49.3
  Top w0.26: IC31.8@59.351,31.055 61.487,31.055 63.27,32.838 69.309,32.838 72.53,36.059 72.622,36.151 ccw(c72.438,36.335) 72.622,36.518 72.501,36.639 cw(c72.55,36.688) 72.501,36.737 72.729,36.965 cw(c72.777,36.916) 72.826,36.965 73.436,36.355 ccw(c73.485,36.404) 73.533,36.355 73.761,36.583 ccw(c73.712,36.632) 73.761,36.68 73.151,37.29 cw(c73.2,37.339) 73.151,37.387 73.379,37.615 cw(c73.428,37.566) 73.477,37.615 73.598,37.494 ccw(c73.782,37.678) 73.965,37.494 74.402,37.93 75.468,38.997 75.56,39.089 ccw(c75.376,39.272) 75.56,39.456 75.439,39.577 cw(c75.488,39.626) 75.439,39.675 75.667,39.902 cw(c75.715,39.854) 75.764,39.902 76.374,39.293 ccw(c76.422,39.342) 76.471,39.293 76.699,39.521 ccw(c76.65,39.569) 76.699,39.618 76.578,39.739 cw(c76.762,39.923) 76.578,40.107 77.032,40.561 78.482,42.01 83.421,42.01 85,43.589 85,45.262 84.5,45.762 84.5,46.686 84.725,46.911 84.725,55.573 84.962,55.81 86.57,55.81 JB3.44@86.575,55.805
DAC_DATA8: IC31.4 JB3.38 | length 47.8
  Top w0.26: IC31.4@59.351,29.055 59.353,29.056 61.777,29.056 63.042,30.321 69.717,30.321 80.296,40.9 86.414,40.9 88.4,42.886 88.4,53.916 88.006,54.31 86.58,54.31 JB3.38@86.575,54.305
DAC_DATA9: IC31.3 JB3.47 | length 47.9
  Top w0.26: IC31.3@59.351,28.555 59.353,28.553 61.126,28.553 v1(61.128,28.551) ; JB3.47@82.875,56.805 v1(83.95,56.805)
  L3 w0.18: v1(61.128,28.551) 62.55,29.973 62.55,33.825 64,35.275 69.073,35.275 69.498,34.85 72.476,34.85 75.867,38.241 75.867,51.673 80.999,56.805 v1(83.95,56.805)
DAC_DATA10: IC31.2 JB3.42 | length 51.7
  Top w0.26: 60.009,28.045 60.001,28.053 59.353,28.053 IC31.2@59.351,28.055 60.001,28.055 60.111,27.945 70.206,27.945 75.065,32.804 75.6,32.804 82.56,39.764 86.453,39.764 89.431,42.741 89.431,54.224 88.35,55.305 JB3.42@86.575,55.305
DAC_DATA11: IC31.1 JB3.41 | length 46.8
  Top w0.26: v1@59.351,26.862 IC31.1@59.351,27.555 ; JB3.41@82.875,55.305 v1(83.95,55.305)
  L3 w0.18: v1(59.351,26.862) 60.795,26.862 63.22,29.287 63.22,30.687 65.413,32.88 72.451,32.88 78.46,38.889 78.46,51.14 79.635,52.315 79.635,53.51 81.43,55.305 v1(83.95,55.305)
DAC_DATA12: IC31.40 JB3.37 | length 47.3
  Top w0.26: IC31.40@58.601,26.805 58.601,26.54 59.319,25.823 59.319,25.698 v1(59.364,25.652) ; JB3.37@82.875,54.305 v1(83.95,54.305)
  L3 w0.18: v1(59.364,25.652) 61.227,25.652 64.225,28.65 64.225,29.68 64.786,30.241 70.366,30.241 71.508,31.383 72.633,31.383 79.442,38.192 79.442,51.305 81.238,53.1 82.745,53.1 v1(83.95,54.305)
DAC_DATA13: IC31.39 JB3.40 | length 50.7
  Top w0.26: IC31.39@58.101,26.805 58.101,25.556 58.47,25.187 v1(58.47,25.123) ; v1(85.4,54.8) 85.402,54.802 86.572,54.802 JB3.40@86.575,54.805
  L3 w0.18: v1(58.47,25.123) 59.143,24.45 61.75,24.45 62.426,25.126 68.601,25.126 77.738,34.263 77.738,35.629 79.997,37.889 79.997,50.047 81.45,51.5 82.1,51.5 v1(85.4,54.8)
DAC_DCLKIO: IC31.16 JB3.59 | length 48.8
  Top w0.26: IC31.16@56.101,32.805 56.106,32.81 56.106,33.577 56.106,35.424 63.233,42.55 63.233,46.322 64.971,48.06 68.505,48.06 69.685,49.24 69.777,49.332 ccw(c69.593,49.516) 69.777,49.7 69.656,49.821 cw(c69.705,49.869) 69.656,49.918 69.884,50.146 cw(c69.932,50.097) 69.981,50.146 70.591,49.536 ccw(c70.64,49.585) 70.688,49.536 70.916,49.764 ccw(c70.867,49.813) 70.916,49.862 70.306,50.471 cw(c70.355,50.52) 70.306,50.569 70.534,50.796 cw(c70.583,50.748) 70.632,50.796 71.241,50.187 ccw(c71.29,50.236) 71.339,50.187 71.567,50.415 ccw(c71.518,50.463) 71.567,50.512 70.957,51.122 cw(c71.006,51.17) 70.957,51.219 71.185,51.447 cw(c71.233,51.398) 71.282,51.447 71.892,50.837 ccw(c71.941,50.886) 71.989,50.837 72.217,51.065 ccw(c72.168,51.114) 72.217,51.163 71.608,51.772 cw(c71.656,51.821) 71.608,51.87 71.835,52.097 cw(c71.884,52.049) 71.933,52.097 72.054,51.977 ccw(c72.238,52.16) 72.421,51.977 72.941,52.496 72.973,52.528 73.065,52.62 ccw(c72.881,52.804) 73.065,52.987 72.944,53.108 cw(c72.992,53.157) 72.944,53.206 73.171,53.434 cw(c73.22,53.385) 73.269,53.434 73.39,53.313 ccw(c73.574,53.497) 73.758,53.313 74.25,53.805 80.256,59.811 82.869,59.811 JB3.59@82.875,59.805
DAC_nCS: IC31.38 JB2.12 TP24.1 | length 77.8
  Top w0.125: IC31.38@57.601,26.805 57.601,25.373 58.289,24.685 60.975,24.685 62.987,24.685 63.772,25.471 68.677,25.471 75.137,31.93 76.9,31.93 84.851,31.93 86.8,33.879 86.8,38.566 90.5,42.266 90.5,45.262 91.457,46.219 91.457,53.342 91.006,53.793 v1(91.006,54.939) ; v1(95.581,68.003) 95.975,67.609 JB2.12@95.975,66.704
  L4 w0.125: v1(91.006,54.939) 93.651,57.584 95.726,57.584 98.127,59.986 98.127,65.655 95.851,67.931 95.653,67.931 v1(95.581,68.003)
DAC_O1_OUT1: J3.19 R36.2 | length 5.3
  Top w0.125: J3.19@68.299,83.619 68.557,83.877 69.442,83.877 71.159,85.594 R36.2@72.777,85.594
DAC_O1_OUT2: J3.22 R38.2 | length 9.5
  Top w0.125: J3.22@65.759,86.159 67.035,87.435 69.418,87.435 70.268,88.285 70.268,89.576 70.853,90.162 R38.2@72.809,90.162
DAC_RESET: IC31.35 JB3.60 R20.2 TP29.1 | length 78.3
  Top w0.125: R20.2@56.101,22.846 IC31.35@56.101,26.805 ; R20.2@56.12,22.845 56.867,23.592 57.864,23.592 59.551,21.905 61.903,21.905 63.416,20.393 69.336,20.393 78.939,29.995 86.905,29.995 88,31.09 88,33.045 88.4,33.445 88.4,38.06 91.89,41.55 91.89,44.362 93.145,45.617 93.145,55.185 92.757,55.573 89.082,55.573 88.7,55.955 88.7,58.784 87.68,59.805 JB3.60@86.575,59.805
  Top w0.22: R20.2@56.1,22.845 R20.2@56.101,22.846
DAC_SCLK: IC31.36 JB2.24 TP22.1 | length 81.5
  Top w0.125: IC31.36@56.601,26.805 56.601,25.402 59.233,22.77 69.622,22.77 TP22.1@75.566,28.714 76.652,29.8 77.35,29.8 77.725,30.175 78.765,30.175 78.835,30.245 86.801,30.245 87.5,30.944 87.5,32.957 87.89,33.347 87.89,38.247 91.457,41.814 91.457,44.8 92.425,45.768 92.425,54.868 v1(92.496,54.939) ; JB2.24@98.975,66.704 98.975,67.641 99.1,67.766 v1(99.1,67.8)
  L4 w0.125: v1(92.496,54.939) 92.496,55.02 94.288,56.812 96.431,56.812 99.04,59.421 99.04,62.226 99.463,62.648 99.463,63.422 98.975,63.91 98.975,64.485 99.437,64.947 99.437,65.697 99.1,66.034 v1(99.1,67.8)
DAC_SDIO: IC31.37 JB2.14 TP23.1 | length 79.3
  Top w0.125: IC31.37@57.101,26.805 57.101,25.389 59.028,23.462 60.271,23.462 63.405,23.462 64.852,24.91 69.959,24.91 75.695,30.646 76.9,30.646 77.549,31.295 85.272,31.295 87.175,33.198 87.175,38.257 90.936,42.018 90.936,45.012 91.974,46.05 91.974,53.981 91.75,54.205 v1(91.75,54.939) ; JB2.14@96.475,66.704 v1(96.475,68.003)
  L4 w0.125: v1(91.75,54.939) 94.01,57.2 96.067,57.2 98.487,59.621 98.487,65.991 v1(96.475,68.003)
DI0: JB1.37 R93.2 | length 149.1
  Top w0.125: v1(102.401,37.329) 102.441,37.369 102.441,38.37 JB1.37@102.475,38.404
  L3 w0.125: v1(98.621,12.35) 98.621,26.121 99.8,27.3 99.8,33.599 99.83,33.629 99.83,36.005 100.275,36.45 101.596,36.45 102.401,37.255 v1(102.401,37.329)
  L4 w0.125: v1(14.1,46.825) 14.034,46.759 14.034,42.866 14.575,42.325 14.575,35.286 16.45,33.411 16.45,32.731 17.419,31.762 19.78,31.762 21.867,29.675 26.161,29.675 30.729,25.107 31.25,24.586 31.25,18.377 45.6,4.027 46.462,3.165 52.537,3.165 53.476,4.104 84.368,4.104 84.53,3.943 94.962,3.943 97.55,6.53 97.55,10.45 98.621,11.521 v1(98.621,12.35)
  Bot w0.125: R93.2@13.318,46.84 13.333,46.825 v1(14.1,46.825)
DI1: JB1.36 R87.2 | length 163.3
  Top w0.16: JB1.36@101.975,34.704 v1(101.975,35.779)
  L3 w0.125: v1(99.764,12.35) 99.764,26.125 100.47,26.83 100.47,32.076 100.949,32.555 100.949,34.321 101.969,35.341 101.969,35.773 v1(101.975,35.779)
  L4 w0.125: v1(13.95,61.825) 13.95,52.331 13.09,51.471 13.09,43.449 14.23,42.309 14.23,35.277 16.2,33.307 16.2,32.628 17.315,31.512 19.676,31.512 21.764,29.425 26.057,29.425 30.479,25.003 30.98,24.502 30.98,18.075 45.554,3.501 46.14,2.915 53.052,2.915 53.366,3.229 83.963,3.229 84.426,3.693 95.893,3.693 98.725,6.525 98.725,10.318 99.756,11.349 v1@99.756,12.35
  Bot w0.125: R87.2@13.286,61.809 13.302,61.825 v1(13.95,61.825)
DO0: JB1.51 R89.2 | length 161
  Top w0.125: v1(12.048,42.288) 12.51,42.75 14.302,42.75 14.375,42.823 14.375,43.355 R89.2@14.55,43.53 ; JB1.51@105.975,38.404 105.981,38.41 105.981,39.473 v1(105.987,39.479)
  L3 w0.125: v1(105.987,39.479) 105.987,35.013 106.875,34.125 106.875,32.209 106.604,31.938 106.604,30.021 107.275,29.35 v1(107.275,12.226)
  L4 w0.125: v1(12.048,42.288) 12.048,41.502 12.153,41.397 12.153,35.88 14.65,33.383 14.65,32.325 16.55,30.425 18.725,30.425 22.072,27.078 26.966,27.078 29.875,24.169 29.875,17.075 44.323,2.627 45.037,1.913 53.469,1.913 53.572,2.015 100.356,2.227 104.073,2.227 104.11,2.264 107.225,5.379 107.225,12.176 v1(107.275,12.226)
DO1: JB1.48 R81.2 | length 167.6
  Top w0.125: v1(12.837,57.125) 12.939,57.125 13.166,57.352 13.317,57.352 13.775,57.81 R81.2@13.775,58.555 ; JB1.48@104.975,34.704 v1(104.975,35.779)
  L3 w0.125: v1(104.525,12.226) 104.525,12.285 104.849,12.609 104.849,28.501 104.4,28.95 104.4,30.85 105.987,32.438 105.987,33.938 105.575,34.35 105.575,35.179 v1(104.975,35.779)
  L4 w0.125: v1(12.837,57.125) 12.837,56.656 13.025,56.468 13.025,56.1 12.128,55.203 12.128,43.371 12.486,43.014 12.486,41.743 12.403,41.66 12.403,35.984 14.9,33.486 14.9,32.691 16.916,30.675 19.144,30.675 22.444,27.375 27.022,27.375 30.125,24.272 30.125,17.65 44.797,2.978 45.612,2.163 53.366,2.163 53.68,2.477 99.973,2.477 ccw(c99.973,2.602) 99.988,2.478 100.289,2.514 104.525,6.75 v1(104.525,12.226)
EN1: D31.2 JB1.27 R157.1 SW4.4 | length 31.5
  Top w0.125: D31.2@92.96,28.802 91.737,28.802 91.232,28.297 SW4.4@90.707,28.297 90.43,28.573 90.43,29.331 89.794,29.967 89.794,34.404 89.431,34.767 89.431,37.183 92.029,39.782 92.029,40.096 92.475,40.541 92.475,40.918 92.725,41.168 92.725,42.537 93.767,43.58 98.454,43.58 99.299,42.734 99.299,42.219 99.731,41.787 99.902,41.787 99.975,41.713 JB1.27@99.975,38.404
  Bot w0.254: v1(99.975,40.038) 100.022,40.085 100.022,40.358 100.38,40.716 R157.1@100.4,40.716
ENC_N: C21.2 IC20.19 | length 53.9
  Top w0.16: v1(57.378,88.429) 57.443,88.494 57.763,88.494 57.921,88.652 58.081,88.652 58.353,88.652 cw(c58.353,88.604) 58.401,88.604 58.401,88.103 ccw(c58.449,88.103) 58.449,88.055 58.673,88.055 ccw(c58.673,88.103) 58.721,88.103 58.721,88.652 58.732,88.652 60.292,88.652 60.807,89.167 62.328,89.167 63.938,87.557 63.938,59.86 63.784,59.707 v1(63.784,59.615)
  L3 w0.125: v1(58.452,49.943) 58.452,50.044 58.602,50.194 58.602,52.006 59.886,53.29 61.46,53.29 63.91,55.74 63.91,59.387
  Bot w0.16: C21.2@55.717,88.707 55.487,88.937 55.471,88.937 55.377,89.031 55.377,89.257 55.471,89.351 55.986,89.351 56.267,89.07 56.274,89.07 56.757,88.587 57.127,88.587 57.286,88.429 v1(57.378,88.429) ; v1(58.452,49.943) 58.452,49.857 58.63,49.679 58.63,49.413 58.59,49.373 58.59,48.978 58.5,48.888 IC20.19@58.5,48.575
ENC_P: C20.2 IC20.20 | length 53.8
  Top w0.16: v1(57.378,89.056) 57.408,89.025 57.868,89.025 57.921,88.972 58.865,88.972 60.16,88.972 60.675,89.487 62.461,89.487 64.258,87.69 64.258,59.86 64.411,59.707 v1(64.411,59.615)
  L3 w0.125: v1(59.128,49.927) 59.128,50.029 58.977,50.179 58.977,51.851 60.041,52.915 61.616,52.915 64.285,55.584 64.285,59.387
  Bot w0.16: C20.2@54.717,88.707 54.947,88.937 54.963,88.937 55.057,89.031 55.057,89.39 55.338,89.671 56.119,89.671 56.587,89.202 56.587,89.195 56.885,88.897 57.127,88.897 57.286,89.056 v1(57.378,89.056) ; IC20.20@59,48.575 59,48.888 58.91,48.978 58.91,49.24 58.95,49.28 58.95,49.664 59.128,49.842 v1(59.128,49.927)
eSD_CLK: IC6.19 J8.5 | length 16.7
  Bot w0.125: J8.5@102.5,8.6 102.5,11.075 102.662,11.237 102.662,14.081 104.001,15.419 104.001,20.595 105.45,22.045 105.45,23.401 104.989,23.862 IC6.19@104.955,23.862
eSD_CMD: IC6.20 J8.3 | length 17.6
  Bot w0.125: J8.3@100.3,8.6 100.3,13.26 103.498,16.458 103.498,21.338 104.389,22.229 104.389,23.267 104.156,23.5 104.156,23.818 104.554,24.216 IC6.20@104.602,24.216
eSD_DAT0: IC6.18 J8.7 | length 16.4
  Bot w0.125: J8.7@104.7,8.6 104.7,10.343 106.728,12.371 106.728,19.181 106.157,19.752 106.157,23.65 IC6.18@105.945,23.862
eSD_DAT1: IC6.16 J8.8 | length 20.4
  Bot w0.125: J8.8@105.8,8.6 105.8,9.956 109.513,13.669 109.513,23.837 108.675,24.675 107.916,24.675 107.399,24.158 107.064,24.158 IC6.16@106.652,24.569
eSD_DAT2: IC6.23 J8.1 | length 18.9
  Bot w0.125: J8.1@98.1,8.6 98.1,19.836 101.666,23.402 IC6.23@103.541,25.276
eSD_DAT3: IC6.22 J8.2 | length 18.8
  Bot w0.125: J8.2@99.2,9 99.2,13.2 98.35,14.05 98.35,19.7 98.825,20.175 99.147,20.175 IC6.22@103.894,24.923
ETH_LED1: JB1.39 R91.1 | length 116.2
  Top w0.125: v1(31.14,25.73) 31.14,25.629 30.899,25.387 30.899,14.001 34.45,10.45 34.45,5.7 37.572,2.578 55.549,2.578 56.221,3.25 66.2,3.25 70.55,7.6 70.55,16.545 72.925,18.92 77.467,23.462 v1(79.925,23.462) ; JB1.39@102.975,38.404 v1(102.975,39.479)
  L3 w0.125: v1(79.925,23.462) 79.94,23.448 86.973,23.448 94.45,30.925 95.219,30.925 98.119,33.825 98.119,37.244 99.475,38.6 102.096,38.6 v1(102.975,39.479)
  Bot w0.125: R91.1@30.514,24.92 30.595,24.92 31.013,25.338 31.013,25.501 31.14,25.629 v1(31.14,25.73)